# Altium PCB PWR Board 10A.PcbDoc (part 10 of 10)
Units mm, origin at the board's own origin, x right, y up, seen from the top; angles counter-clockwise.
Board outline 355 x 325 mm, 4 copper layers (Top Layer, Layer 1, Layer 2, Bottom Layer), stack 1.636 mm thick; 617 components, 308 nets, 1518 pads, 1199 vias.
Unrouted connection lines stored in the file: 361.
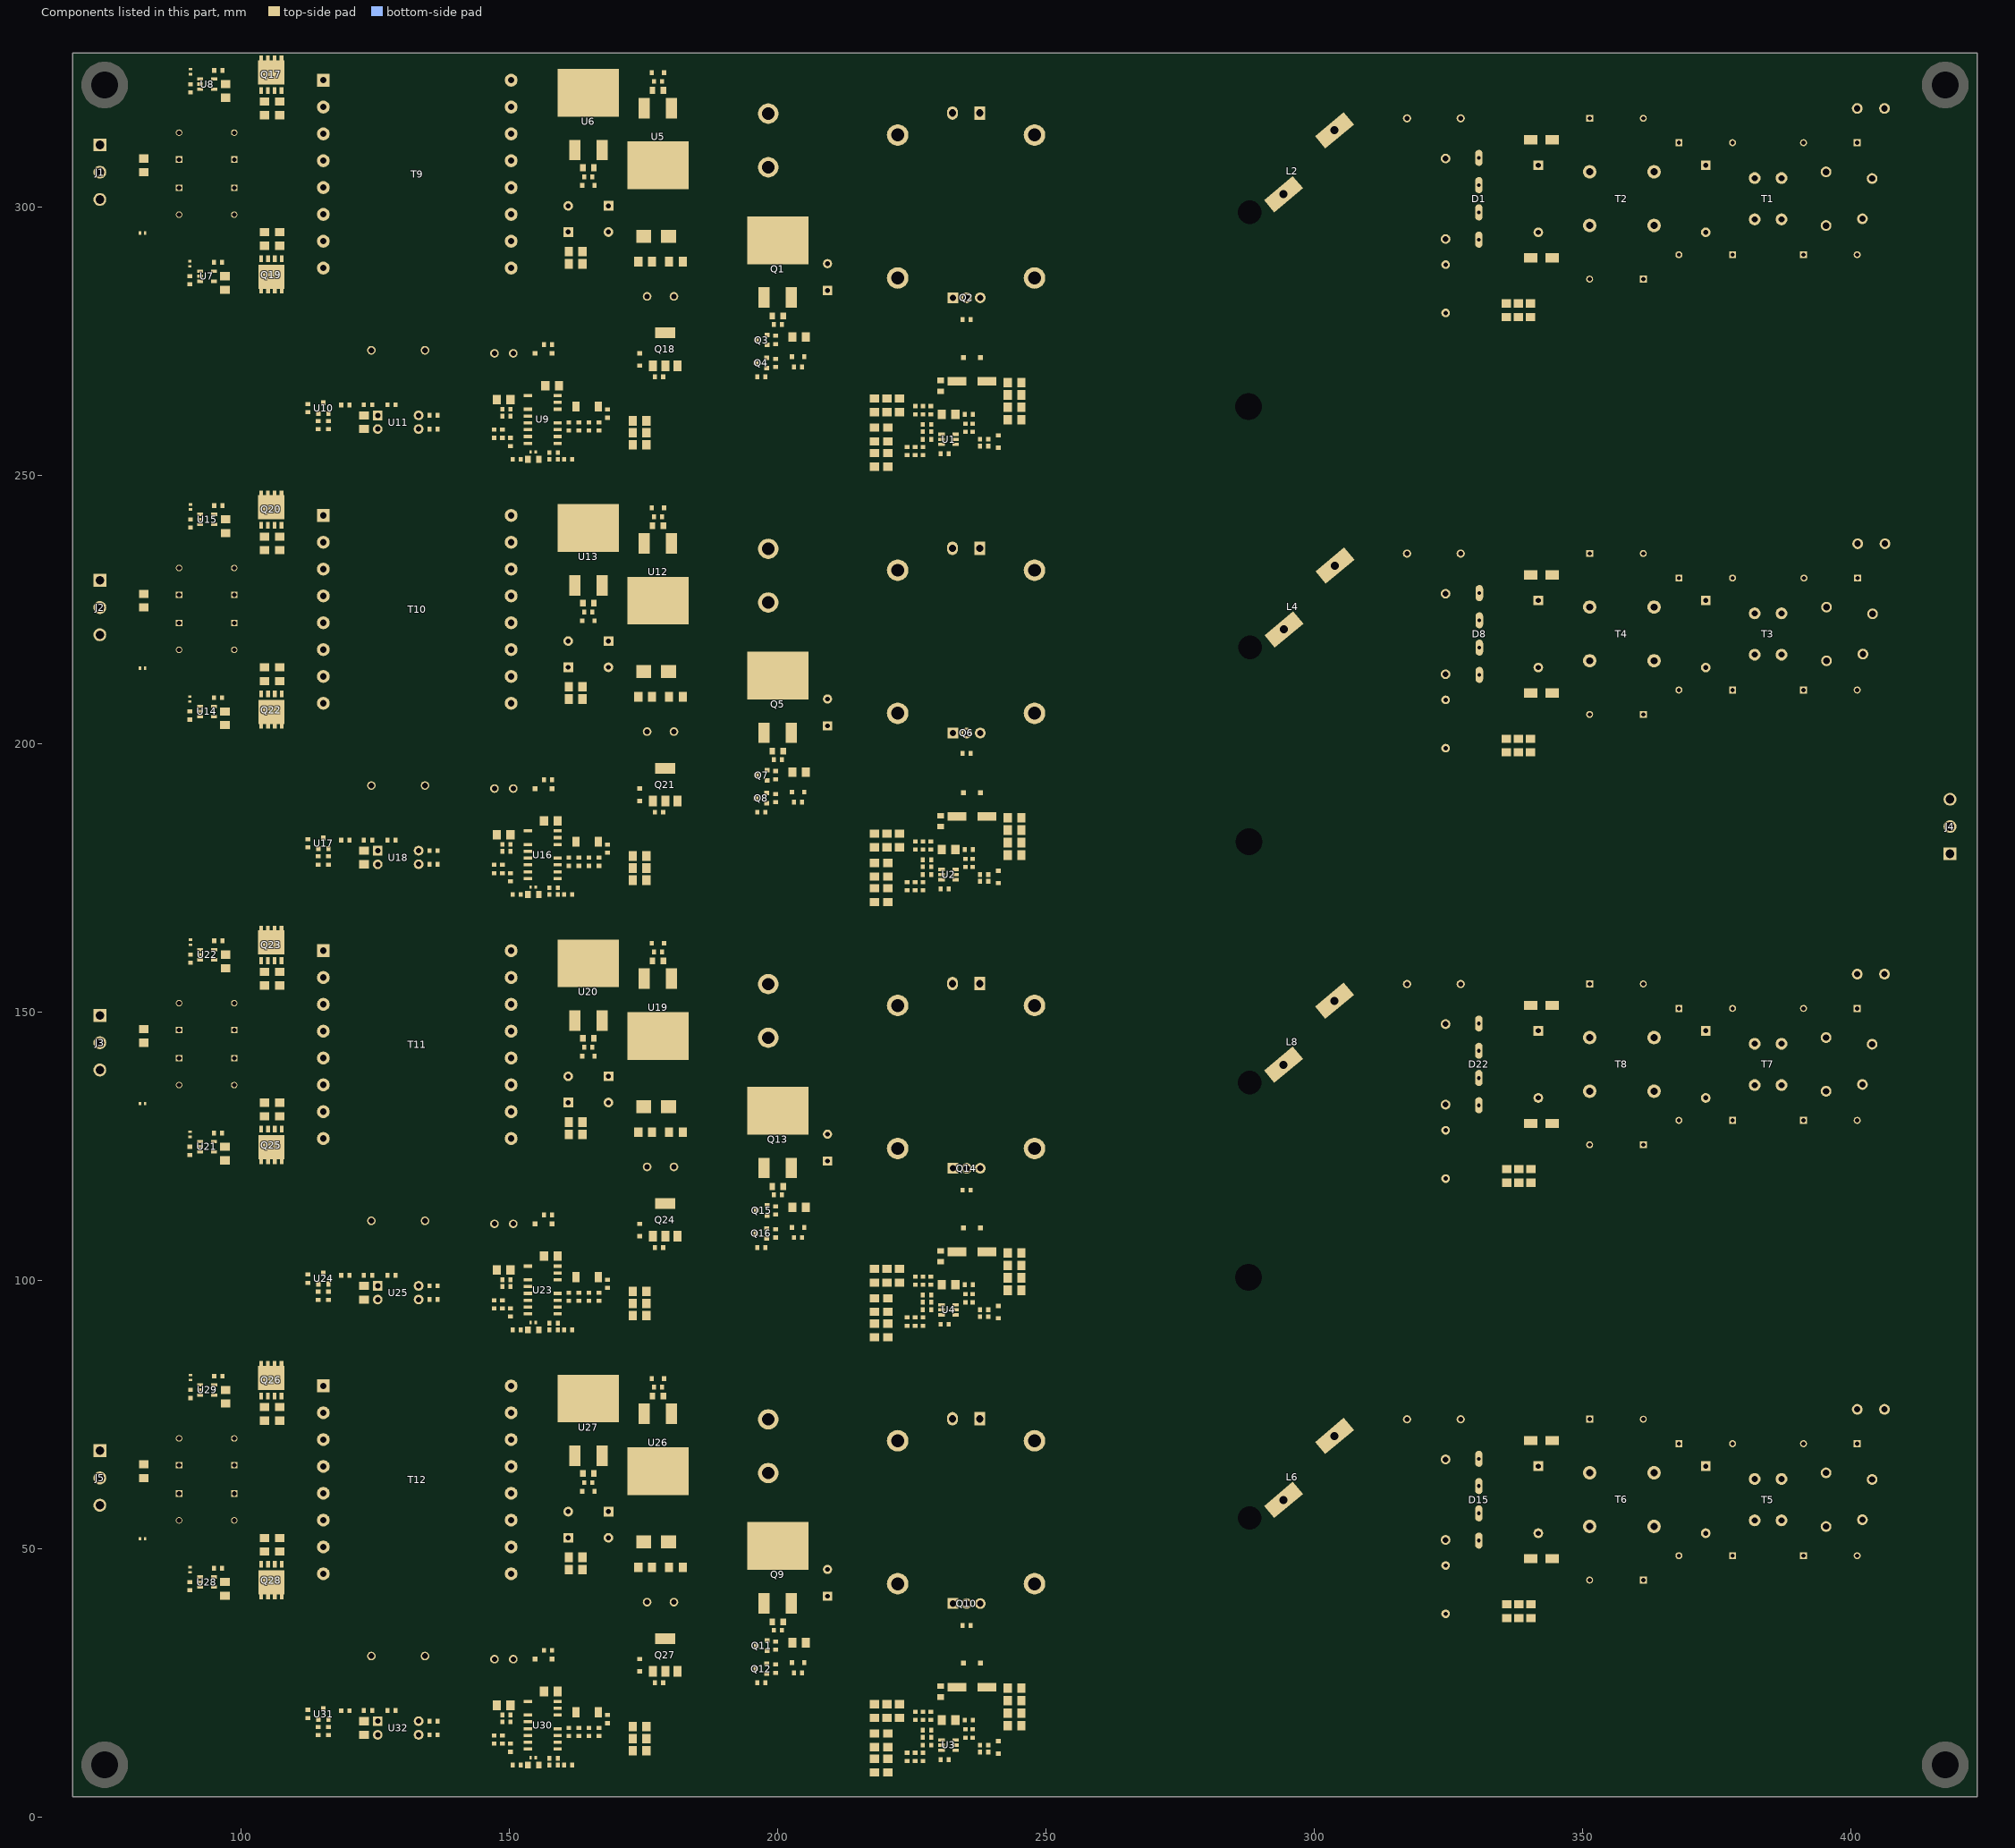
[diagram p8: the components of this part, seen from the top]

## Other copper (continued)
Layer 2:
  rectangle net RVCC-C4: 200.05,30.759 202.844,33.883
  rectangle net RVCC-C4: 236.245,28.115 240.995,29.972
  rectangle net RVCC-C3: 200.05,111.861 202.844,114.986
  rectangle net RVCC-C3: 236.245,109.217 240.995,111.074
  rectangle net RVCC-C2: 200.05,192.964 202.844,196.088
  rectangle net RVCC-C2: 236.245,190.319 240.995,192.176
  rectangle net RVCC-C1: 236.245,271.422 240.995,273.279
  rectangle net RVCC-C1: 200.05,274.066 202.844,277.19
  rectangle net NetR209_2: 163.576,20.244 166.116,23.774
  rectangle net NetR119_2: 163.576,263.551 166.116,267.081
  rectangle net NetR149_2: 163.576,182.448 166.116,185.979
  rectangle net NetR119_2: 163.932,263.551 165.837,267.081
  rectangle net NetR149_2: 163.932,182.448 165.837,185.979
  rectangle net NetR209_2: 163.932,20.244 165.837,23.774
  rectangle net NetR179_2: 163.576,101.346 166.116,104.876
  pour cut-out: 69.745,14.943 cw(c74.617,9.682) 79.819,4.746 78.917,4.746 78.911,4.752 ccw(c74.617,9.682) 69.745,14.042
  pour cut-out: 413.691,3.682 cw(c417.618,9.682) 423.618,13.609 423.618,12.279 ccw(c417.618,9.682) 415.02,3.682
  pour cut-out: 413.691,328.682 ccw(c417.618,322.682) 423.618,318.755 423.618,320.085 cw(c417.618,322.682) 415.021,328.682
  pour cut-out: 79.878,327.554 cw(c74.617,322.682) 69.681,317.48 69.681,318.382 69.687,318.387 ccw(c74.617,322.682) 78.977,327.554
  pour cut-out: 393.676,52.693 393.676,66.138 405.917,66.138 405.917,52.693
  pour cut-out: 399.303,77.637 408.396,77.637 408.396,74.182 399.303,74.182
  pour cut-out: 380.381,53.319 380.381,64.987 389.052,64.987 389.052,53.319
  pour cut-out: 371.248,51.322 371.248,67.901 375.136,67.901 375.136,51.322
  pour cut-out: 361.618,51.601 361.618,66.663 365.506,66.663 365.506,51.601
  pour cut-out: 366.573,49.784 369.392,49.784 369.392,47.346 366.573,47.346
  pour cut-out: 366.573,70.651 369.392,70.651 369.392,68.213 366.573,68.213
  pour cut-out: 399.811,49.784 402.63,49.784 402.63,47.346 399.811,47.346
  pour cut-out: 399.811,70.651 402.63,70.651 402.63,68.213 399.811,68.213
  pour cut-out: 393.676,133.796 393.676,147.24 405.917,147.24 405.917,133.796
  pour cut-out: 399.303,158.739 408.396,158.739 408.396,155.285 399.303,155.285
  pour cut-out: 380.381,134.422 380.381,146.089 389.052,146.089 389.052,134.422
  pour cut-out: 371.248,132.424 371.248,149.003 375.136,149.003 375.136,132.424
  pour cut-out: 361.618,132.703 361.618,147.766 365.506,147.766 365.506,132.703
  pour cut-out: 366.573,130.887 369.392,130.887 369.392,128.448 366.573,128.448
  pour cut-out: 366.573,151.753 369.392,151.753 369.392,149.315 366.573,149.315
  pour cut-out: 399.811,130.887 402.63,130.887 402.63,128.448 399.811,128.448
  pour cut-out: 399.811,151.753 402.63,151.753 402.63,149.315 399.811,149.315
  pour cut-out: 393.763,213.994 393.763,227.439 406.004,227.439 406.004,213.994
  pour cut-out: 399.39,238.938 408.483,238.938 408.483,235.483 399.39,235.483
  pour cut-out: 380.468,214.62 380.468,226.288 389.139,226.288 389.139,214.62
  pour cut-out: 371.335,212.623 371.335,229.202 375.223,229.202 375.223,212.623
  pour cut-out: 361.705,212.902 361.705,227.964 365.593,227.964 365.593,212.902
  pour cut-out: 366.66,211.085 369.479,211.085 369.479,208.647 366.66,208.647
  pour cut-out: 366.66,231.952 369.479,231.952 369.479,229.514 366.66,229.514
  pour cut-out: 399.898,211.085 402.717,211.085 402.717,208.647 399.898,208.647
  pour cut-out: 399.898,231.952 402.717,231.952 402.717,229.514 399.898,229.514
  pour cut-out: 399.811,313.055 402.63,313.055 402.63,310.617 399.811,310.617
  pour cut-out: 399.811,292.188 402.63,292.188 402.63,289.75 399.811,289.75
  pour cut-out: 366.573,313.055 369.392,313.055 369.392,310.617 366.573,310.617
  pour cut-out: 366.573,292.188 369.392,292.188 369.392,289.75 366.573,289.75
  pour cut-out: 361.618,294.005 361.618,309.067 365.506,309.067 365.506,294.005
  pour cut-out: 371.248,293.726 371.248,310.305 375.136,310.305 375.136,293.726
  pour cut-out: 380.381,295.723 380.381,307.391 389.052,307.391 389.052,295.723
  pour cut-out: 399.303,320.041 408.396,320.041 408.396,316.586 399.303,316.586
  pour cut-out: 393.676,295.097 393.676,308.542 405.917,308.542 405.917,295.097
  pour cut-out: 158.648,26.898 168.046,26.898 332.969,26.898 332.969,3.682 158.648,3.682
  pour cut-out: 158.648,108.001 168.046,108.001 332.969,108.001 332.969,78.359 158.648,78.359
  pour cut-out: 158.735,189.102 168.133,189.102 333.056,189.102 333.056,159.46 158.735,159.46
  pour cut-out: 158.648,270.205 168.046,270.205 332.969,270.205 332.969,240.563 158.648,240.563
Bottom Layer:
  region net 24VDC-C4: 99.356,58.596 99.356,61.885 98.156,61.885 98.156,58.596
  region net 24VDC-C4: 99.356,63.858 99.356,67.146 98.156,67.146 98.156,63.858
  region net 24VDC-C2: 99.356,220.801 99.356,224.09 98.156,224.09 98.156,220.801
  rectangle net 24VDC-C4: 69.571,65.252 85.039,84.937
  rectangle net 24VDC-C3: 69.571,146.355 85.039,166.04
  rectangle net 24VDC-C1: 69.571,308.559 85.039,315.508
  rectangle net VD_R2-C4: 112.674,72.821 126.035,84.937
  rectangle net 24VDC-C4: 118.643,19.075 126.035,72.009
  rectangle net 24VDC-C4: 112.674,53.467 126.035,72.009
  rectangle net 24VDC-C4: 96.139,19.075 126.035,39.547
  rectangle net VD_R2-C3: 112.483,153.924 125.843,166.04
  rectangle net 24VDC-C3: 118.452,100.177 125.843,153.111
  rectangle net 24VDC-C3: 112.483,134.569 125.843,153.111
  rectangle net 24VDC-C3: 95.948,100.177 125.843,120.65
  rectangle net VD_R2-C1: 112.674,316.128 126.035,328.244
  rectangle net 24VDC-C1: 118.643,262.382 126.035,315.316
  rectangle net 24VDC-C1: 112.674,296.774 126.035,315.316
  rectangle net 24VDC-C1: 96.139,262.382 126.035,282.854
  rectangle net NetR179_2: 163.932,102.362 165.837,104.876
  rectangle net NetC52_1: 385.343,57.348 405.486,66.776
  rectangle net NetC52_1: 394.487,57.348 403.606,77.585
  rectangle net NetC75_1: 385.343,138.45 405.486,147.879
  rectangle net NetC75_1: 393.471,138.45 402.59,158.688
  rectangle net NetC29_1: 385.343,218.649 405.573,228.077
  rectangle net NetC29_1: 394.574,218.649 403.693,238.886
  rectangle net NetC6_1: 394.487,299.752 403.606,319.989
  rectangle net H_V-C4: 185.623,44.526 192.659,84.886
  rectangle net H_V-C4: 188.214,20.205 192.659,71.78
  rectangle net H_V-C3: 185.623,125.628 192.659,165.989
  rectangle net H_V-C3: 188.214,101.307 192.659,152.882
  rectangle net H_V-C2: 185.623,206.73 192.659,247.091
  rectangle net H_V-C2: 188.214,182.409 192.659,233.985
  rectangle net NetR209_2: 163.932,21.259 165.837,23.774
  region net RVCC-C4: 170.536,21.869 170.536,23.774 168.402,23.774 168.402,21.869
  region net RVCC-C3: 170.536,102.971 170.536,104.876 168.402,104.876 168.402,102.971
  rectangle net NetR149_2: 163.932,183.464 165.837,185.979
  region net RVCC-C2: 170.536,184.074 170.536,185.979 168.402,185.979 168.402,184.074
  rectangle net NetC81_2: 193.802,125.628 213.335,151.943
  rectangle net NetC58_2: 193.802,44.526 213.335,70.84
  rectangle net NetC35_2: 193.802,206.73 213.335,233.045
  rectangle net H_V-C2: 235.737,233.934 244.196,247.091
  rectangle net H_V-C2: 185.623,233.934 213.335,247.091
  rectangle net H_V-C2: 185.623,239.166 244.196,247.091
  rectangle net H_V-C3: 185.623,158.064 244.196,165.989
  rectangle net NetC50_2: 320.65,45.567 333.019,53.035
  rectangle net NetC73_2: 320.65,126.67 333.019,134.137
  rectangle net NetC27_2: 320.65,206.868 332.308,214.336
  rectangle net NetC4_2: 320.65,287.971 333.019,295.439
  rectangle net NetC53_1: 361.036,59.614 384.073,66.776
  rectangle net NetC53_1: 361.036,59.639 370.764,70.994
  rectangle net NetC48_2: 361.036,47.193 370.764,58.548
  rectangle net NetC48_2: 361.036,51.386 384.073,58.548
  rectangle net NetC76_1: 361.036,140.716 384.073,147.879
  rectangle net NetC76_1: 361.036,140.741 370.764,152.097
  rectangle net NetC71_2: 361.036,128.296 370.764,139.651
  rectangle net NetC71_2: 361.036,132.488 384.073,139.651
  rectangle net NetC30_1: 361.036,220.915 384.073,228.078
  rectangle net NetC30_1: 361.036,220.941 370.764,232.296
  rectangle net NetC25_2: 361.036,208.495 370.764,219.85
  rectangle net NetC25_2: 361.036,212.687 384.073,219.85
  rectangle net NetC2_2: 361.036,293.79 384.073,300.952
  rectangle net NetC2_2: 361.036,289.597 370.764,300.952
  rectangle net NetC7_1: 361.036,302.043 370.764,313.398
  rectangle net NetC7_1: 361.036,302.018 384.073,309.18
  region net RVCC-C4: 202.159,33.477 200.254,33.477 200.254,31.343 202.159,31.343
  region net RVCC-C3: 202.159,114.579 200.254,114.579 200.254,112.446 202.159,112.446
  region net RVCC-C2: 202.159,195.681 200.254,195.681 200.254,193.548 202.159,193.548
  region net VCC-C4: 162.309,30.004 162.309,31.909 160.176,31.909 160.176,30.004
  rectangle net HS-C4: 158.039,25.806 160.249,27.127
  region net VCC-C3: 162.309,111.106 162.309,113.011 160.176,113.011 160.176,111.106
  rectangle net HS-C3: 158.039,106.908 160.249,108.229
  rectangle net HS-C2: 158.039,188.011 160.249,189.331
  region net VCC-C2: 162.309,192.209 162.309,194.114 160.176,194.114 160.176,192.209
  rectangle net 24VDC-C2: 96.139,181.28 126.035,201.752
  rectangle net H_V-C1: 188.214,263.512 192.659,315.087
  region net RVCC-C1: 202.413,276.784 200.508,276.784 200.508,274.65 202.413,274.65
  region net VCC-C1: 162.309,273.311 162.309,275.216 160.176,275.216 160.176,273.311
  region net RVCC-C1: 170.536,265.176 170.536,267.081 168.402,267.081 168.402,265.176
  rectangle net NetR119_2: 163.932,264.566 165.837,267.081
  rectangle net HS-C1: 158.039,269.113 160.249,270.434
  rectangle net H_V-C4: 235.737,71.729 244.196,84.531
  rectangle net H_V-C4: 185.623,76.962 244.196,84.886
  rectangle net H_V-C4: 185.623,71.729 213.335,84.886
  rectangle net NetD48_1: 170.663,48.539 177.927,78.587
  rectangle net 24VDC-C4: 112.674,53.467 122.936,57.708
  rectangle net VD_R1-C4: 108.229,40.36 117.653,52.476
  rectangle net VD_R1-C4: 101.829,40.36 117.653,46.075
  rectangle net VD_R2-C4: 101.93,79.222 122.098,84.937
  rectangle net 24VDC-C4: 82.042,57.378 85.039,69.951
  rectangle net 24VDC-C4: 81.534,57.378 89.484,68.402
  region net 24VDC-C3: 99.356,139.698 99.356,142.987 98.156,142.987 98.156,139.698
  region net 24VDC-C3: 99.356,144.96 99.356,148.249 98.156,148.249 98.156,144.96
  rectangle net 24VDC-C3: 81.534,138.481 89.484,149.504
  rectangle net 24VDC-C3: 82.042,138.481 85.039,151.054
  rectangle net VD_R2-C3: 101.93,160.325 122.098,166.04
  rectangle net VD_R1-C3: 101.829,121.463 117.653,127.178
  rectangle net VD_R1-C3: 108.229,121.463 117.653,133.578
  rectangle net 24VDC-C3: 112.674,134.569 122.936,138.811
  rectangle net NetD42_1: 170.663,129.641 177.927,159.69
  rectangle net H_V-C3: 185.623,152.832 213.335,165.989
  rectangle net H_V-C3: 235.737,152.832 244.196,165.989
  rectangle net NetD36_1: 170.663,210.744 177.927,240.792
  rectangle net 24VDC-C2: 112.674,215.671 126.035,234.213
  rectangle net 24VDC-C2: 112.674,215.671 122.936,219.913
  rectangle net 24VDC-C2: 118.643,181.28 126.035,234.213
  rectangle net 24VDC-C2: 96.139,181.28 122.936,201.752
  rectangle net VD_R1-C2: 108.229,202.565 117.653,214.681
  rectangle net VD_R1-C2: 101.829,202.565 117.653,208.28
  rectangle net VD_R2-C2: 101.93,241.427 122.098,247.142
  rectangle net VD_R2-C2: 112.674,235.026 126.035,247.142
  rectangle net 24VDC-C2: 69.571,227.457 85.039,247.142
  rectangle net 24VDC-C2: 82.042,219.583 85.039,232.156
  rectangle net 24VDC-C2: 81.534,219.583 89.484,230.606
  region net 24VDC-C2: 99.356,226.062 99.356,229.351 98.156,229.351 98.156,226.062
  rectangle net H_V-C1: 185.623,287.833 192.659,328.193
  region net 24VDC-C1: 99.356,301.903 99.356,305.192 98.156,305.192 98.156,301.903
  region net 24VDC-C1: 99.356,307.165 99.356,310.454 98.156,310.454 98.156,307.165
  rectangle net 24VDC-C1: 81.534,300.685 89.484,311.709
  rectangle net 24VDC-C1: 82.042,300.685 85.039,313.258
  rectangle net VD_R2-C1: 101.93,322.529 122.098,328.244
  rectangle net VD_R1-C1: 101.829,283.667 117.653,289.382
  rectangle net VD_R1-C1: 108.229,283.667 117.653,295.783
  rectangle net 24VDC-C1: 112.674,296.774 122.936,301.015
  rectangle net NetD30_1: 170.663,291.846 177.927,321.894
  rectangle net NetC12_2: 193.802,287.833 213.335,314.147
  rectangle net H_V-C1: 185.623,315.036 213.335,328.193
  rectangle net H_V-C1: 185.623,320.269 244.196,328.193
  rectangle net H_V-C1: 235.737,315.036 244.196,328.193
  rectangle net NetC6_1: 385.343,299.752 405.486,309.18
  pour cut-out: 185.623,48.895 185.623,44.008 182.596,44.008 182.596,48.895
  pour cut-out: 185.623,129.997 185.623,125.11 182.596,125.11 182.596,129.997
  pour cut-out: 185.623,211.099 185.623,206.213 182.596,206.213 182.596,211.099
  pour cut-out: 185.623,292.202 185.623,287.315 182.596,287.315 182.596,292.202
  pour cut-out: 78.544,3.682 ccw(c74.617,9.682) 68.618,13.611 68.618,12.282 cw(c74.617,9.682) 77.214,3.682
  pour cut-out: 78.544,328.682 cw(c74.617,322.682) 68.618,318.753 68.618,320.082 ccw(c74.617,322.682) 77.214,328.682
  pour cut-out: 150.365,53.526 cw(c150.365,55.273) 148.618,55.273 cw(c150.365,55.273) 150.365,57.02 cw(c150.365,55.273) 152.112,55.273 cw(c150.365,55.273)
  pour cut-out: 150.365,58.526 cw(c150.365,60.273) 148.618,60.273 cw(c150.365,60.273) 150.365,62.02 cw(c150.365,60.273) 152.112,60.273 cw(c150.365,60.273)
  pour cut-out: 150.365,78.526 cw(c150.365,80.273) 148.618,80.273 cw(c150.365,80.273) 150.365,82.02 cw(c150.365,80.273) 152.112,80.273 cw(c150.365,80.273)
  pour cut-out: 150.365,159.628 cw(c150.365,161.375) 148.618,161.375 cw(c150.365,161.375) 150.365,163.122 cw(c150.365,161.375) 152.112,161.375 cw(c150.365,161.375)
  pour cut-out: 150.365,139.628 cw(c150.365,141.375) 148.618,141.375 cw(c150.365,141.375) 150.365,143.122 cw(c150.365,141.375) 152.112,141.375 cw(c150.365,141.375)
  pour cut-out: 150.365,134.628 cw(c150.365,136.375) 148.618,136.375 cw(c150.365,136.375) 150.365,138.122 cw(c150.365,136.375) 152.112,136.375 cw(c150.365,136.375)
  pour cut-out: 150.365,215.731 cw(c150.365,217.478) 148.618,217.478 cw(c150.365,217.478) 150.365,219.225 cw(c150.365,217.478) 152.112,217.478 cw(c150.365,217.478)
  pour cut-out: 150.365,220.731 cw(c150.365,222.478) 148.618,222.478 cw(c150.365,222.478) 150.365,224.225 cw(c150.365,222.478) 152.112,222.478 cw(c150.365,222.478)
  pour cut-out: 150.365,240.731 cw(c150.365,242.478) 148.618,242.478 cw(c150.365,242.478) 150.365,244.225 cw(c150.365,242.478) 152.112,242.478 cw(c150.365,242.478)
  pour cut-out: 150.365,321.833 cw(c150.365,323.58) 148.618,323.58 cw(c150.365,323.58) 150.365,325.327 cw(c150.365,323.58) 152.112,323.58 cw(c150.365,323.58)
  pour cut-out: 150.365,301.833 cw(c150.365,303.58) 148.618,303.58 cw(c150.365,303.58) 150.365,305.327 cw(c150.365,303.58) 152.112,303.58 cw(c150.365,303.58)
  pour cut-out: 150.365,296.833 cw(c150.365,298.58) 148.618,298.58 cw(c150.365,298.58) 150.365,300.327 cw(c150.365,298.58) 152.112,298.58 cw(c150.365,298.58)
  region net EARTH: 415.836,3.681 cw(c417.618,9.682) 423.619,11.463 423.618,11.462 423.618,3.682 423.617,3.681
  region net EARTH: 415.836,328.683 ccw(c417.618,322.682) 423.619,320.901 423.618,320.902 423.618,328.682 423.617,328.683
  pour cut-out: 413.691,328.682 ccw(c417.618,322.682) 423.618,318.755 423.618,320.085 cw(c417.618,322.682) 415.021,328.682
  pour cut-out: 413.691,3.682 cw(c417.618,9.682) 423.618,13.609 423.618,12.279 ccw(c417.618,9.682) 415.02,3.682
  region net EARTH: 76.398,3.681 ccw(c74.617,9.682) 68.616,11.463 68.617,11.462 68.617,3.682 68.617,3.681
  region net EARTH: 76.398,328.683 cw(c74.617,322.682) 68.616,320.901 68.617,320.902 68.617,328.682 68.617,328.683
  pour cut-out: 244.196,85.404 245.872,85.404 245.872,67.292 235.211,67.292 235.211,71.755 244.196,71.755
  pour cut-out: 244.196,166.467 245.872,166.467 245.872,148.394 235.211,148.394 235.211,152.857 244.196,152.857
  pour cut-out: 244.196,247.57 245.872,247.57 245.872,229.496 235.211,229.496 235.211,233.959 244.196,233.959
  pour cut-out: 244.196,328.193 245.872,328.193 245.872,310.599 235.211,310.599 235.211,315.062 244.196,315.062
  pour cut-out: 299.993,320.013 294.608,320.013 294.608,310.21 297.046,310.21 300.679,306.578 300.679,293.599 297.326,290.246 307.587,290.246 308.4,291.059 308.4,303.646 299.993,312.053
  pour cut-out: 300.112,238.91 294.727,238.91 294.727,229.107 297.165,229.107 300.798,225.475 300.798,212.496 297.445,209.143 307.706,209.143 308.519,209.956 308.519,222.543 300.112,230.95
  pour cut-out: 300.025,157.809 294.64,157.809 294.64,148.006 297.078,148.006 300.711,144.373 300.711,131.394 297.358,128.041 307.619,128.041 308.432,128.854 308.432,141.441 300.025,149.848
  pour cut-out: 300.025,76.706 294.64,76.706 294.64,66.903 297.078,66.903 300.711,63.271 300.711,50.292 297.358,46.939 307.619,46.939 308.432,47.752 308.432,60.339 300.025,68.746
  pour cut-out: 161.827,106.52 167.916,106.52 167.916,100.983 161.827,100.983
  pour cut-out: 166.674,35.079 166.674,32.353 159.618,32.353 159.618,35.079
  pour cut-out: 166.674,278.386 166.674,275.66 159.618,275.66 159.618,278.386
  pour cut-out: 166.674,197.284 166.674,194.558 159.618,194.558 159.618,197.284
  pour cut-out: 166.674,116.182 166.674,113.456 159.618,113.456 159.618,116.182
  pour cut-out: 192.659,315.087 192.659,286.893 214.706,286.893 214.706,315.087
  pour cut-out: 192.659,71.78 192.659,43.586 214.706,43.586 214.706,71.78
  pour cut-out: 192.659,152.882 192.659,124.688 214.706,124.688 214.706,152.882
  pour cut-out: 192.659,233.985 192.659,205.791 214.706,205.791 214.706,233.985
  pour cut-out: 161.827,25.418 167.916,25.418 167.916,19.88 161.827,19.88
  pour cut-out: 161.827,268.725 167.916,268.725 167.916,263.187 161.827,263.187
  pour cut-out: 161.827,187.622 167.916,187.622 167.916,182.085 161.827,182.085
  pour cut-out: 162.636,290.601 162.636,290.348 163.947,290.348 163.947,290.601
  pour cut-out: 162.636,302.798 162.636,302.54 170.404,302.54 170.404,302.798
  pour cut-out: 162.636,221.696 162.636,221.437 170.404,221.437 170.404,221.696
  pour cut-out: 162.636,209.499 162.636,209.245 163.947,209.245 163.947,209.499
  pour cut-out: 162.636,140.594 162.636,140.335 170.404,140.335 170.404,140.594
  pour cut-out: 162.636,128.397 162.636,128.143 163.947,128.143 163.947,128.397
  pour cut-out: 162.636,47.294 162.636,47.041 163.947,47.041 163.947,47.294
  pour cut-out: 162.636,59.491 162.636,59.233 170.404,59.233 170.404,59.491
  pour cut-out: 185.623,85.145 172.949,85.145 172.949,84.886 185.623,84.886
  pour cut-out: 185.623,166.248 172.949,166.248 172.949,165.989 185.623,165.989
  pour cut-out: 185.623,328.452 172.949,328.452 172.949,328.193 185.623,328.193
  pour cut-out: 185.623,247.35 172.949,247.35 172.949,247.091 185.623,247.091
  pour cut-out: 181.102,48.28 185.623,48.28 185.623,48.895 181.102,48.895
  pour cut-out: 181.102,129.382 185.623,129.382 185.623,129.997 181.102,129.997
  pour cut-out: 181.102,210.485 185.623,210.485 185.623,211.099 181.102,211.099
  pour cut-out: 181.102,291.587 185.623,291.587 185.623,292.202 181.102,292.202
  pour cut-out: 415.976,192.354 420.929,192.354 420.929,182.118 415.976,182.118
Multi-Layer:
  pour cut-out: 280.427,100.545 ccw(c287.743,100.545) 287.743,93.228 ccw(c287.743,100.545) 295.06,100.545 ccw(c287.743,100.545) 287.743,107.861 ccw(c287.743,100.545)
  pour cut-out: 280.514,181.646 ccw(c287.83,181.646) 287.83,174.33 ccw(c287.83,181.646) 295.147,181.646 ccw(c287.83,181.646) 287.83,188.963 ccw(c287.83,181.646)
  pour cut-out: 280.427,262.749 ccw(c287.743,262.749) 287.743,255.432 ccw(c287.743,262.749) 295.06,262.749 ccw(c287.743,262.749) 287.743,270.066 ccw(c287.743,262.749)

## Silkscreen, mask and mechanical layers (free items; w line width, h text height)
Top Overlay:
  lines w0.127: 155.257,10.598 156.432,10.598 156.432,7.171 156.244,6.983 ; 155.257,91.701 156.432,91.701 156.432,88.274 156.244,88.085 ; 155.257,172.809 156.432,172.809 156.432,169.382 156.244,169.194 ; 155.257,253.905 156.432,253.905 156.432,250.478 156.244,250.29 ; 156.972,6.985 156.75,7.207 156.75,10.344 157.029,10.344 ; 156.972,88.087 156.75,88.309 156.75,91.447 157.029,91.447 ; 156.972,169.196 156.75,169.418 156.75,172.555 157.029,172.555 ; 156.972,250.292 156.75,250.514 156.75,253.651 157.029,253.651 ; 235.568,16.75 235.568,17.03 238.252,17.03 238.252,17.212 ; 235.568,97.853 235.568,98.132 238.252,98.132 238.252,98.315 ; 235.568,178.955 235.568,179.234 238.252,179.234 238.252,179.417 ; 235.568,260.057 235.568,260.337 238.252,260.337 238.252,260.519 ; 236.889,16.75 239.742,16.75 239.742,17.212 ; 236.889,97.853 239.742,97.853 239.742,98.315 ; 236.889,178.955 239.742,178.955 239.742,179.417 ; 236.889,260.057 239.742,260.057 239.742,260.519 ; 201.727,269.599 201.727,269.599
  lines w0.178: 144.704,11.277 148.179,11.277 148.179,13.138 ; 144.704,92.38 148.179,92.38 148.179,94.241 ; 144.704,173.488 148.179,173.488 148.179,175.349 ; 144.704,254.584 148.179,254.584 148.179,256.445 ; 200.204,30.655 201.727,30.655 201.727,26.292 ; 200.204,111.757 201.727,111.757 201.727,106.611 ; 200.204,192.86 201.727,192.86 201.727,188.497 ; 200.204,273.962 201.727,273.962 201.727,269.599 ; 399.405,65.583 399.405,66.537 406.618,66.537 ; 399.405,146.686 399.405,147.64 406.618,147.64 ; 399.492,226.884 399.492,227.838 406.705,227.838
  text "+24V" at 79.383,313.343 h1 r270
  text "GND" at 79.383,307.763 h1 r270
  text "EARTH" at 79.383,303.683 h1 r270
  text "+24V" at 79.383,232.241 h1 r270
  text "GND" at 79.383,226.661 h1 r270
  text "EARTH" at 79.383,222.58 h1 r270
  text "NTRL" at 412.842,186.053 h1 r90
  text "EARTH" at 412.842,181.973 h1 r90
  text "LIVE" at 412.842,177.228 h1 r90
  text "+24V" at 79.383,151.138 h1 r270
  text "GND" at 79.383,145.558 h1 r270
  text "EARTH" at 79.383,141.478 h1 r270
  text "+24V" at 79.383,70.036 h1 r270
  text "GND" at 79.383,64.456 h1 r270
  text "EARTH" at 79.383,60.376 h1 r270
Bottom Overlay:
  text "Rev-v1.0" at 400.613,321.661 h3
  text "PWR Board - 24V 10A" at 400.613,7.644 h3
Bottom Solder:
  rectangle: 413.487,204.374 421.437,264.532
  rectangle: 413.487,104.484 421.437,164.643
Board Outline:
  lines w0.127: 127.565,48.523 127.565,77.023 131.065,77.023 131.065,48.523 127.565,48.523 ; 127.565,129.625 131.065,129.625 131.065,158.125 127.565,158.125 127.565,129.625 ; 127.565,210.728 131.065,210.728 131.065,239.228 127.565,239.228 127.565,210.728 ; 127.565,291.83 131.065,291.83 131.065,320.33 127.565,320.33 127.565,291.83 ; 328.137,53.441 328.137,54.041 334.239,54.041 334.239,37.531 333.492,37.531 333.492,53.441 328.137,53.441 ; 328.137,64.121 334.239,64.121 334.239,80.631 333.492,80.631 333.492,64.721 328.137,64.721 328.137,64.121 ; 328.137,134.544 333.492,134.544 333.492,118.633 334.239,118.633 334.239,135.144 328.137,135.144 328.137,134.544 ; 328.137,145.223 328.137,145.823 333.492,145.823 333.492,161.734 334.239,161.734 334.239,145.223 328.137,145.223 ; 328.137,295.845 328.137,296.445 334.239,296.445 334.239,279.935 333.492,279.935 333.492,295.845 328.137,295.845 ; 328.137,306.525 334.239,306.525 334.239,323.035 333.492,323.035 333.492,307.125 328.137,307.125 328.137,306.525 ; 328.224,214.742 328.224,215.342 334.326,215.342 334.326,198.832 333.579,198.832 333.579,214.742 328.224,214.742 ; 328.224,225.422 334.326,225.422 334.326,241.932 333.579,241.932 333.579,226.022 328.224,226.022 328.224,225.422
  lines w0.381: 68.618,3.682 423.618,3.682 423.618,328.682 68.618,328.682 68.618,3.682
Fabrication:
  drawing of 295 lines, arcs and shapes, not listed
  text "Layer" at 453.907,457.962 h1.52
  text "Name" at 464.318,457.962 h1.52
  text "Material" at 487.934,457.962 h1.52
  text "Thickness" at 509.772,457.962 h1.52
  text "Constant" at 526.278,457.962 h1.52
  text "Board Layer Stack" at 540.752,457.962 h1.52
  text "Top Overlay" at 464.318,454.914 h1.52
  text "Top Solder" at 464.318,451.866 h1.52
  text "Solder Resist" at 487.934,451.866 h1.52
  text "0.010mm" at 509.772,451.866 h1.52
  text "3.5" at 526.278,451.866 h1.52
  text "1" at 453.907,448.818 h1.52
  text "Top Layer" at 464.318,448.818 h1.52
  text "0.070mm" at 509.772,448.818 h1.52
  text "Dielectric 2" at 464.318,445.77 h1.52
  text "PP-006" at 487.934,445.77 h1.52
  text "0.203mm" at 509.772,445.77 h1.52
  text "4.1" at 526.278,445.77 h1.52
  text "2" at 453.907,442.722 h1.52
  text "Layer 1" at 464.318,442.722 h1.52
  text "CF-004" at 487.934,442.722 h1.52
  text "0.030mm" at 509.772,442.722 h1.52
  text "Dielectric 1" at 464.318,439.674 h1.52
  text "FR-4" at 487.934,439.674 h1.52
  text "1.030mm" at 509.772,439.674 h1.52
  text "4.8" at 526.278,439.674 h1.52
  text "3" at 453.907,436.626 h1.52
  text "Layer 2" at 464.318,436.626 h1.52
  text "CF-004" at 487.934,436.626 h1.52
  text "0.030mm" at 509.772,436.626 h1.52
  text "Dielectric 3" at 464.318,433.578 h1.52
  text "PP-006" at 487.934,433.578 h1.52
  text "0.203mm" at 509.772,433.578 h1.52
  text "4.1" at 526.278,433.578 h1.52
  text "4" at 453.907,430.53 h1.52
  text "Bottom Layer" at 464.318,430.53 h1.52
  text "0.070mm" at 509.772,430.53 h1.52
  text "Bottom Solder" at 464.318,427.482 h1.52
  text "Solder Resist" at 487.934,427.482 h1.52
  text "0.010mm" at 509.772,427.482 h1.52
  text "3.5" at 526.278,427.482 h1.52
  text "Bottom Overlay" at 464.318,424.434 h1.52
  text "Total board thickness:" at 453.907,421.386 h1.52
  text "1.656mm" at 509.772,421.386 h1.52
  text "Fabrication Notes:" at 458.27,306.461 h20
  text "Outer Copper Weight: 2 Oz / Inner Copper Weight: 1 Oz / PCB Thickness: 1.6mm" at 455.27,186.835 h13
Drill Drawing:
  drawing of 191 lines, arcs and shapes, not listed
  text "Symbol" at 71.564,457.427 h1.83
  text "Count" at 84.414,457.427 h1.83
  text "Hole Size" at 100.919,457.427 h1.83
  text "Plated" at 130.121,457.427 h1.83
  text "Hole Type" at 142.97,457.427 h1.83
  text "Drill Layer Pair" at 161.609,457.427 h1.83
  text "Via/Pad" at 199.697,457.427 h1.83
  text "Pad Shape" at 214.679,457.427 h1.83
  text "Template" at 233.623,457.427 h1.83
  text "Description" at 291.009,457.427 h1.83
  text "Hole Tolerance (+)" at 312.695,457.427 h1.83
  text "Hole Tolerance (-)" at 346.568,457.427 h1.83
  text "Hole Length" at 380.442,457.427 h1.83
  text "Routed Path Length" at 409.643,457.427 h1.83
  text "3" at 84.414,453.617 h1.52
  text "5.000mm (196.85mil)" at 100.919,453.617 h1.52
  text "NPTH" at 130.121,453.617 h1.52
  text "Round" at 142.97,453.617 h1.52
  text "Top Layer - Bottom Layer" at 161.609,453.617 h1.52
  text "Pad" at 199.697,453.617 h1.52
  text "Rounded" at 214.679,453.617 h1.52
  text "c0hn500" at 233.623,453.617 h1.52
  text "-" at 380.442,453.617 h1.52
  text "-" at 409.643,453.617 h1.52
  text "G" at 70.826,453.363 h1.69
  text "4" at 84.414,449.807 h1.52
  text "4.400mm (173.23mil)" at 100.919,449.807 h1.52
  text "NPTH" at 130.121,449.807 h1.52
  text "Round" at 142.97,449.807 h1.52
  text "Top Layer - Bottom Layer" at 161.609,449.807 h1.52
  text "Pad" at 199.697,449.807 h1.52
  text "Rounded" at 214.679,449.807 h1.52
  text "c0hn440" at 233.623,449.807 h1.52
  text "-" at 380.442,449.807 h1.52
  text "-" at 409.643,449.807 h1.52
  text "4" at 84.414,445.997 h1.52
  text "5.000mm (196.85mil)" at 100.919,445.997 h1.52
  text "PTH" at 130.121,445.997 h1.52
  text "Round" at 142.97,445.997 h1.52
  text "Top Layer - Bottom Layer" at 161.609,445.997 h1.52
  text "Pad" at 199.697,445.997 h1.52
  text "Rounded" at 214.679,445.997 h1.52
  text "c872h500" at 233.623,445.997 h1.52
  text "-" at 380.442,445.997 h1.52
  text "-" at 409.643,445.997 h1.52
  text "D" at 70.826,445.743 h1.69
  text "8" at 84.414,442.187 h1.52
  text "0.820mm (32.28mil)" at 100.919,442.187 h1.52
  text "PTH" at 130.121,442.187 h1.52
  text "Round" at 142.97,442.187 h1.52
  text "Top Layer - Bottom Layer" at 161.609,442.187 h1.52
  text "Pad" at 199.697,442.187 h1.52
  text "Rounded" at 214.679,442.187 h1.52
  text "c160h82" at 233.623,442.187 h1.52
  text "-" at 380.442,442.187 h1.52
  text "-" at 409.643,442.187 h1.52
  text "8" at 84.414,438.377 h1.52
  text "1.092mm (43.00mil)" at 100.919,438.377 h1.52
  text "PTH" at 130.121,438.377 h1.52
  text "Round" at 142.97,438.377 h1.52
  text "Top Layer - Bottom Layer" at 161.609,438.377 h1.52
  text "Pad" at 199.697,438.377 h1.52
  text "Rounded" at 214.679,438.377 h1.52
  text "c180h109m180p0" at 233.623,438.377 h1.52
  text "-" at 380.442,438.377 h1.52
  text "-" at 409.643,438.377 h1.52
  text "8" at 84.414,434.567 h1.52
  text "1.100mm (43.31mil)" at 100.919,434.567 h1.52
  text "PTH" at 130.121,434.567 h1.52
  text "Round" at 142.97,434.567 h1.52
  text "Top Layer - Bottom Layer" at 161.609,434.567 h1.52
  text "Pad" at 199.697,434.567 h1.52
  text "Rounded" at 214.679,434.567 h1.52
  text "(Mixed)" at 233.623,434.567 h1.52
  text "-" at 380.442,434.567 h1.52
  text "-" at 409.643,434.567 h1.52
  text "B" at 70.826,434.313 h1.69
  text "8" at 84.414,430.757 h1.52
  text "1.200mm (47.24mil)" at 100.919,430.757 h1.52
  text "PTH" at 130.121,430.757 h1.52
  text "Round" at 142.97,430.757 h1.52
  text "Top Layer - Bottom Layer" at 161.609,430.757 h1.52
  text "Pad" at 199.697,430.757 h1.52
  text "Rounded" at 214.679,430.757 h1.52
  text "(Mixed)" at 233.623,430.757 h1.52
  text "-" at 380.442,430.757 h1.52
  text "-" at 409.643,430.757 h1.52
  text "8" at 84.414,426.947 h1.52
  text "1.400mm (55.12mil)" at 100.919,426.947 h1.52
  text "PTH" at 130.121,426.947 h1.52
  text "Round" at 142.97,426.947 h1.52
  text "Top Layer - Bottom Layer" at 161.609,426.947 h1.52
  text "Pad" at 199.697,426.947 h1.52
  text "(Mixed)" at 214.679,426.947 h1.52
  text "(Mixed)" at 233.623,426.947 h1.52
  text "-" at 380.442,426.947 h1.52
  text "-" at 409.643,426.947 h1.52
  text "8" at 84.414,423.137 h1.52
  text "1.500mm (59.06mil)" at 100.919,423.137 h1.52
  text "PTH" at 130.121,423.137 h1.52
  text "Rectangle" at 142.97,423.137 h1.52
  text "Top Layer - Bottom Layer" at 161.609,423.137 h1.52
  text "Pad" at 199.697,423.137 h1.52
  text "Rectangle" at 214.679,423.137 h1.52
  text "r700_300h150_550" at 233.623,423.137 h1.52
  text "5.500mm (216.54mil)" at 380.442,423.137 h1.52
  text "5.500mm (216.54mil)" at 409.643,423.137 h1.52
  text "8" at 84.414,419.327 h1.52
  text "2.300mm (90.55mil)" at 100.919,419.327 h1.52
  text "PTH" at 130.121,419.327 h1.52
  text "Round" at 142.97,419.327 h1.52
  text "Top Layer - Bottom Layer" at 161.609,419.327 h1.52
  text "Pad" at 199.697,419.327 h1.52
  text "Rounded" at 214.679,419.327 h1.52
  text "c380h230m390mx390p0" at 233.623,419.327 h1.52
  text "-" at 380.442,419.327 h1.52
  text "-" at 409.643,419.327 h1.52
  text "15" at 84.414,415.517 h1.52
  text "1.600mm (62.99mil)" at 100.919,415.517 h1.52
  text "PTH" at 130.121,415.517 h1.52
  text "Round" at 142.97,415.517 h1.52
  text "Top Layer - Bottom Layer" at 161.609,415.517 h1.52
  text "Pad" at 199.697,415.517 h1.52
  text "(Mixed)" at 214.679,415.517 h1.52
  text "(Mixed)" at 233.623,415.517 h1.52
  text "-" at 380.442,415.517 h1.52
  text "-" at 409.643,415.517 h1.52
  text "A" at 70.826,415.263 h1.69
  text "16" at 84.414,411.707 h1.52
  text "0.700mm (27.56mil)" at 100.919,411.707 h1.52
  text "PTH" at 130.121,411.707 h1.52
  text "Slot" at 142.97,411.707 h1.52
  text "Top Layer - Bottom Layer" at 161.609,411.707 h1.52
  text "Pad" at 199.697,411.707 h1.52
  text "Rounded" at 214.679,411.707 h1.52
  text "r300_140h70_220r70m310_150mx310_150p0" at 233.623,411.707 h1.52
  text "2.200mm (86.62mil)" at 380.442,411.707 h1.52
  text "1.500mm (59.06mil)" at 409.643,411.707 h1.52
  text "16" at 84.414,407.897 h1.52
  text "0.920mm (36.22mil)" at 100.919,407.897 h1.52
  text "PTH" at 130.121,407.897 h1.52
  text "Round" at 142.97,407.897 h1.52
  text "Top Layer - Bottom Layer" at 161.609,407.897 h1.52
  text "Pad" at 199.697,407.897 h1.52
  text "(Mixed)" at 214.679,407.897 h1.52
  text "(Mixed)" at 233.623,407.897 h1.52
  text "-" at 380.442,407.897 h1.52
  text "-" at 409.643,407.897 h1.52
  text "16" at 84.414,404.087 h1.52
  text "1.100mm (43.31mil)" at 100.919,404.087 h1.52
  text "PTH" at 130.121,404.087 h1.52
  text "Round" at 142.97,404.087 h1.52
  text "Top Layer - Bottom Layer" at 161.609,404.087 h1.52
  text "Pad" at 199.697,404.087 h1.52
  text "Rounded" at 214.679,404.087 h1.52
  text "c220h110" at 233.623,404.087 h1.52
  text "-" at 380.442,404.087 h1.52
  text "-" at 409.643,404.087 h1.52
  text "16" at 84.414,400.277 h1.52
  text "1.300mm (51.18mil)" at 100.919,400.277 h1.52
  text "PTH" at 130.121,400.277 h1.52
  text "Round" at 142.97,400.277 h1.52
  text "Top Layer - Bottom Layer" at 161.609,400.277 h1.52
  text "Pad" at 199.697,400.277 h1.52
  text "Rounded" at 214.679,400.277 h1.52
  text "c250h130" at 233.623,400.277 h1.52
  text "-" at 380.442,400.277 h1.52
  text "-" at 409.643,400.277 h1.52
  text "16" at 84.414,396.467 h1.52
  text "2.400mm (94.49mil)" at 100.919,396.467 h1.52
  text "PTH" at 130.121,396.467 h1.52
  text "Round" at 142.97,396.467 h1.52
  text "Top Layer - Bottom Layer" at 161.609,396.467 h1.52
  text "Pad" at 199.697,396.467 h1.52
  text "Rounded" at 214.679,396.467 h1.52
  text "c400h240m420mx420p0" at 233.623,396.467 h1.52
  text "-" at 380.442,396.467 h1.52
  text "-" at 409.643,396.467 h1.52
  text "F" at 70.826,396.213 h1.69
  text "24" at 84.414,392.657 h1.52
  text "0.914mm (36.00mil)" at 100.919,392.657 h1.52
  text "PTH" at 130.121,392.657 h1.52
  text "Round" at 142.97,392.657 h1.52
  text "Top Layer - Bottom Layer" at 161.609,392.657 h1.52
  text "Pad" at 199.697,392.657 h1.52
  text "(Mixed)" at 214.679,392.657 h1.52
  text "(Mixed)" at 233.623,392.657 h1.52
  text "-" at 380.442,392.657 h1.52
  text "-" at 409.643,392.657 h1.52
  text "32" at 84.414,388.847 h1.52
  text "1.000mm (39.37mil)" at 100.919,388.847 h1.52
  text "PTH" at 130.121,388.847 h1.52
  text "Round" at 142.97,388.847 h1.52
  text "Top Layer - Bottom Layer" at 161.609,388.847 h1.52
  text "Pad" at 199.697,388.847 h1.52
  text "(Mixed)" at 214.679,388.847 h1.52
  text "(Mixed)" at 233.623,388.847 h1.52
  text "-" at 380.442,388.847 h1.52
  text "-" at 409.643,388.847 h1.52
  text "C" at 70.826,388.593 h1.69
  text "40" at 84.414,385.037 h1.52
  text "0.850mm (33.47mil)" at 100.919,385.037 h1.52
  text "PTH" at 130.121,385.037 h1.52
  text "Round" at 142.97,385.037 h1.52
  text "Top Layer - Bottom Layer" at 161.609,385.037 h1.52
  text "Pad" at 199.697,385.037 h1.52
  text "(Mixed)" at 214.679,385.037 h1.52
  text "(Mixed)" at 233.623,385.037 h1.52
  text "-" at 380.442,385.037 h1.52
  text "-" at 409.643,385.037 h1.52
  text "48" at 84.414,381.227 h1.52
  text "0.800mm (31.50mil)" at 100.919,381.227 h1.52
  text "PTH" at 130.121,381.227 h1.52
  text "Round" at 142.97,381.227 h1.52
  text "Top Layer - Bottom Layer" at 161.609,381.227 h1.52
  text "Pad" at 199.697,381.227 h1.52
  text "(Mixed)" at 214.679,381.227 h1.52
  text "(Mixed)" at 233.623,381.227 h1.52
  text "-" at 380.442,381.227 h1.52
  text "-" at 409.643,381.227 h1.52
  text "92" at 84.414,377.417 h1.52
  text "1.200mm (47.24mil)" at 100.919,377.417 h1.52
  text "PTH" at 130.121,377.417 h1.52
  text "Round" at 142.97,377.417 h1.52
  text "Top Layer - Bottom Layer" at 161.609,377.417 h1.52
  text "Pad" at 199.697,377.417 h1.52
  text "(Mixed)" at 214.679,377.417 h1.52
  text "(Mixed)" at 233.623,377.417 h1.52
  text "-" at 380.442,377.417 h1.52
  text "-" at 409.643,377.417 h1.52
  text "1199" at 84.414,373.607 h1.52
  text "0.300mm (11.81mil)" at 100.919,373.607 h1.52
  text "PTH" at 130.121,373.607 h1.52
  text "Round" at 142.97,373.607 h1.52
  text "Top Layer - Bottom Layer" at 161.609,373.607 h1.52
  text "Via" at 199.697,373.607 h1.52
  text "Rounded" at 214.679,373.607 h1.52
  text "v60h30" at 233.623,373.607 h1.52
  text "-" at 380.442,373.607 h1.52
  text "-" at 409.643,373.607 h1.52
  text "E" at 70.826,373.353 h1.69
  text "1597 Total" at 84.414,369.797 h1.52
  text "Slot definitions :" at 71.564,366.115 h1.52
  text "Routed Path Length" at 97.795,366.115 h1.52
  text "= Calculated from tool start centre position to tool end centre position." at 125.803,366.115 h1.52
  text "Hole Length" at 97.795,363.575 h1.52
  text "= Routed Path Length + Tool Size = Slot length as defined in the PCB layout" at 115.392,363.575 h1.52

## Dimensions
423.618,328.682 to 423.618,3.682 on Dimension
68.618,328.682 to 423.618,328.682 on Dimension

## Text inside footprints (layer, text, board x,y; h text height)
D1: Top Overlay "+" at 327.972,294.361 h1.33 r270; Top Overlay "-" at 328.139,309.494 h1.33 r270
D8: Top Overlay "-" at 328.393,228.422 h1.33 r270; Top Overlay "+" at 328.048,213.157 h1.33 r270
D15: Top Overlay "+" at 327.972,51.892 h1.33 r270; Top Overlay "-" at 328.139,67.09 h1.33 r270
D22: Top Overlay "+" at 327.997,133.198 h1.33 r270; Top Overlay "-" at 328.368,148.209 h1.33 r270
T1: Top Overlay "1" at 387.658,295.719 h1 r90
T2: Top Overlay "1" at 363.849,294.411 h1 r90
T3: Top Overlay "1" at 387.658,214.617 h1 r90
T4: Top Overlay "1" at 363.849,213.309 h1 r90
T5: Top Overlay "1" at 387.658,53.315 h1 r90
T6: Top Overlay "1" at 363.849,52.007 h1 r90
T7: Top Overlay "1" at 387.658,134.418 h1 r90
T8: Top Overlay "1" at 363.849,133.11 h1 r90
T9: Top Overlay "Board Cutout" at 129.868,299.247 h1.52 r90; Top Overlay "1" at 113.053,323.403 h1; Top Overlay "8" at 112.951,288.148 h1; Top Overlay "9" at 152.601,288.021 h1; Top Overlay "16" at 152.601,323.021 h1
T10: Top Overlay "16" at 152.601,241.918 h1; Top Overlay "9" at 152.601,206.918 h1; Top Overlay "8" at 112.951,207.045 h1; Top Overlay "1" at 113.053,242.3 h1; Top Overlay "Board Cutout" at 129.868,218.145 h1.52 r90
T11: Top Overlay "16" at 152.601,160.816 h1; Top Overlay "9" at 152.601,125.816 h1; Top Overlay "8" at 112.951,125.943 h1; Top Overlay "1" at 113.053,161.198 h1; Top Overlay "Board Cutout" at 129.868,137.043 h1.52 r90
T12: Top Overlay "16" at 152.601,79.714 h1; Top Overlay "9" at 152.601,44.714 h1; Top Overlay "8" at 112.951,44.841 h1; Top Overlay "1" at 113.053,80.096 h1; Top Overlay "Board Cutout" at 129.868,55.94 h1.52 r90